# Altium PCB AirBnB-v1.1.PcbDoc (part 5 of 8)
Units mm, origin at the board's own origin, x right, y up, seen from the top; angles counter-clockwise.
Board outline 135.99 x 145 mm, 4 copper layers (Top Layer, Layer 2, Layer 3, Bottom Layer), stack 1.566 mm thick; 343 components, 205 nets, 1123 pads, 557 vias.
Unrouted connection lines stored in the file: 129.
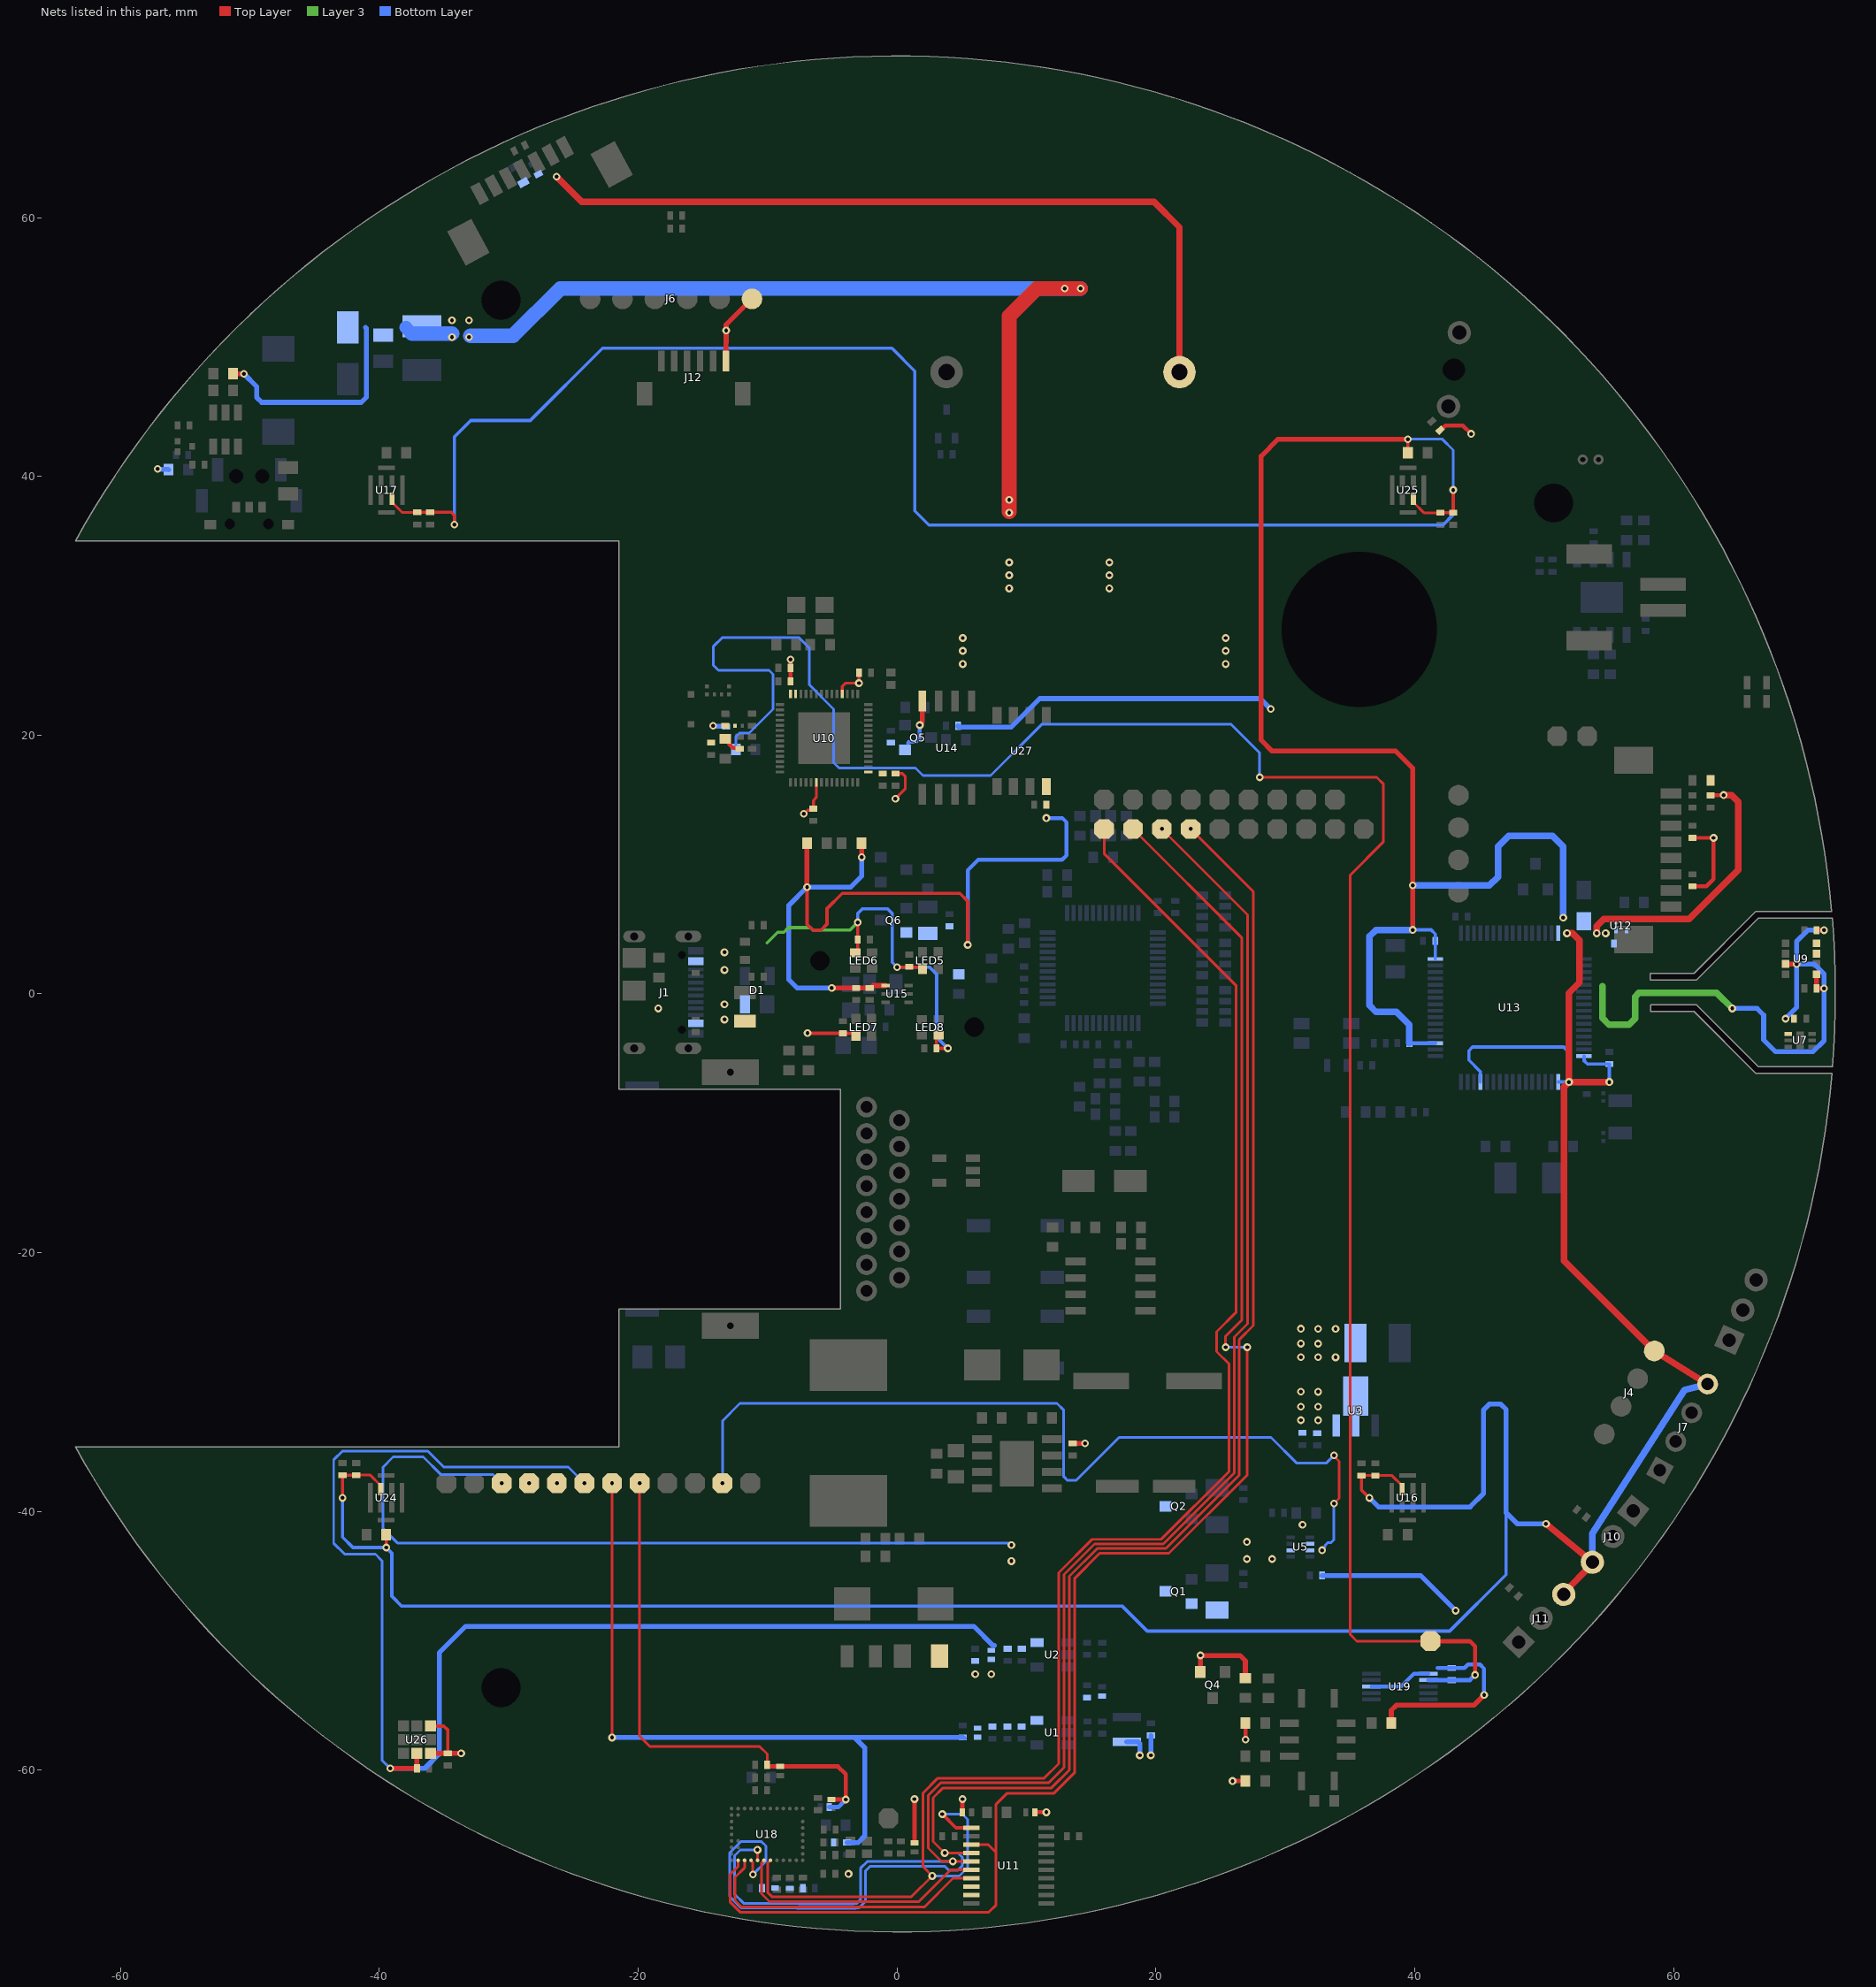
[diagram p4: the nets of this part, all layers, seen from the top]

## Part data (continued)
R51 R53 R58 R59: library part RC0603FR-0749R9L, "RES 49.9 OHM 1% 1/10W 0603", Case Code (Imperial)=0603, Case Code (Metric)=1608, LCSC Part Number=C114625, Manufacturer=Yageo, Max Operating Temperature=155°C, Max Power Dissipation=100mW, Min Operating Temperature=-55°C, Resistance Tolerance=1%, Resistor Type="Thick Film", Temperature Coefficient=100ppm/°C, Voltage Rating=50V, Case/Package=0603, Category="Chip SMD Resistors", ComponentLink1Description=https://datasheet.ciiva.com/11808/0900766b80f96399-11808223.pdf?src-supplier=RSComponents, ComponentLink1URL=https://datasheet.ciiva.com/11808/0900766b80f96399-11808223.pdf?src-supplier=RSComponents, ComponentLink2Description=https://datasheet.ciiva.com/22747/443971-22747527.pdf?src-supplier=Element14, ComponentLink2URL=https://datasheet.ciiva.com/22747/443971-22747527.pdf?src-supplier=Element14, ComponentLink3Description=https://datasheet.ciiva.com/15189/getdatasheetpartid-325421-15189750.pdf?src-supplier=Verical, ComponentLink3URL=https://datasheet.ciiva.com/15189/getdatasheetpartid-325421-15189750.pdf?src-supplier=Verical, Construction=Rectangular, Depth=0.8mm, Features="Moisture Resistant", Height=0.45mm, Item Type=Resistor, Lead Free="Lead Free", Length=1.6mm, Manufacturer Part Number=RC0603FR-0749R9L, Military Standard=Not, Number of Pins=2, Number of Terminations=2, Packaging="Tape and Reel", Power Rating=100mW, Pricing 1="5000=0.00280 (USD)", REACH SVHC="No SVHC", Resistance=49.9R, RoHS=Yes, RoHS Compliant=Yes, Series=RC, Size Code=0603, Stock 1=2075000, Supplier 1="Arrow Electronics", Supplier Part Number 1=RC0603FR-0749R9L, Technology="THICK FILM", Termination=SMD/SMT, Tolerance=1%, Voltage Rating (DC)=50V
R54: library part PE0805FRF470R03L, "RES 0.03 OHM 1% 1/2W 0805", Case/Package=0805, LCSC Part Number=C858599, Manufacturer=Yageo, Max Operating Temperature=170°C, Max Power Dissipation=500mW, Min Operating Temperature=-55°C, Package Quantity=5000, Supplier Part Number 1=7123965, Temperature Coefficient=100ppm/°C, Tolerance=1%, Category="Chip SMD Resistors", ComponentLink1Description=http://www.mouser.com/ds/2/447/PYu-PE_521_RoHS_L_5-1077989.pdf?src-supplier=Mouser, ComponentLink1URL=http://www.mouser.com/ds/2/447/PYu-PE_521_RoHS_L_5-1077989.pdf?src-supplier=Mouser, ComponentLink2Description=http://www.yageo.com/documents/recent/PYu-PE_521_RoHS_L_5.pdf?src-supplier=Digi-Key, ComponentLink2URL=http://www.yageo.com/documents/recent/PYu-PE_521_RoHS_L_5.pdf?src-supplier=Digi-Key, Features="Moisture Resistant,Automotive AEC-Q200", Height=0.024inch, Item Type=Resistor, Length=0.08inch, Manufacturer Part Number=PE0805FRF470R03L, Number of Terminations=2, Packaging="Tape and Reel", Pricing 1="5000=0.175, 10000=0.171, 15000=0.169, 20000=0.168, 25000=0.164 (USD)", RoHS=Yes, RoHS Compliant=Yes, Series=PE, Stock 1=20000, Supplier 1="Future Electronics", Width=0.05inch
R60: library part RC0603FR-074R7L, "RES 4.7 OHM 1% 1/10W 0603", Case Code (Imperial)=0603, Case Code (Metric)=1608, LCSC Part Number=C137705, Manufacturer=Yageo, Max Operating Temperature=155°C, Max Power Dissipation=100mW, Min Operating Temperature=-55°C, Package Quantity=5000, Resistance Tolerance=1%, Resistor Type="Thick Film", Supplier Part Number 1=3598901, Temperature Coefficient=200ppm/°C, Voltage Rating=50V, Case/Package=0603, Category="Chip SMD Resistors", ComponentLink1Description=https://datasheet.ciiva.com/46440/1868787-46440910.pdf?src-supplier=Element14, ComponentLink1URL=https://datasheet.ciiva.com/46440/1868787-46440910.pdf?src-supplier=Element14, ComponentLink2Description=https://datasheet.ciiva.com/12555/rc0603-272842-12555071.pdf?src-supplier=Mouser, ComponentLink2URL=https://datasheet.ciiva.com/12555/rc0603-272842-12555071.pdf?src-supplier=Mouser, Features="Moisture Resistant", Height=0.45mm, Item Type=Resistor, Lead Free="Lead Free", Length=1.6mm, Manufacturer Part Number=RC0603FR-074R7L, Number of Terminations=2, Packaging="Tape and Reel", Pins=2, Power Rating=100mW, Pricing 1="5000=0.0036, 25000=0.0034, 125000=0.0032, 250000=0.0031, 750000=0.0029 (USD)", Reach SVHC Compliant=Unknown, RoHS=Yes, Series=RC, Stock 1=160000, Supplier 1="Future Electronics", Termination=SMD/SMT, Tolerance=1%, Voltage Rating (DC)=50V, Width=0.8mm
R61 R62 R63 R64: library part RC0603FR-0733RL, "RES SMD 0603 33 Ohm 1% 1/10W", Case Code (Imperial)=0603, Case Code (Metric)=1608, LCSC Part Number=C108661, Manufacturer=Yageo, Max Operating Temperature=155°C, Max Power Dissipation=100mW, Min Operating Temperature=-55°C, Package Quantity=1, Resistance Tolerance=1%, Resistor Type="Thick Film", Supplier Part Number 1=311-33.0HRCT-ND, Temperature Coefficient=100ppm/°C, Voltage Rating=75V, Voltage Rating (DC)=50V, Case/Package=0603, Category="Chip SMD Resistors", ComponentLink1Description=https://datasheet.ciiva.com/11808/0900766b80f96399-11808741.pdf?src-supplier=RSComponents, ComponentLink1URL=https://datasheet.ciiva.com/11808/0900766b80f96399-11808741.pdf?src-supplier=RSComponents, ComponentLink2Description=https://datasheet.ciiva.com/2453/pyu-r-int-thick-7-2453952.pdf?src-supplier=Digi-Key, ComponentLink2URL=https://datasheet.ciiva.com/2453/pyu-r-int-thick-7-2453952.pdf?src-supplier=Digi-Key, ComponentLink3Description=https://datasheet.ciiva.com/2453/pyu-r-int-thick-7-2453953.pdf?src-supplier=Digi-Key, ComponentLink3URL=https://datasheet.ciiva.com/2453/pyu-r-int-thick-7-2453953.pdf?src-supplier=Digi-Key, ComponentLink4Description=https://datasheet.ciiva.com/2453/pyu-r-int-thick-7-2453954.pdf?src-supplier=Digi-Key, ComponentLink4URL=https://datasheet.ciiva.com/2453/pyu-r-int-thick-7-2453954.pdf?src-supplier=Digi-Key, ComponentLink5Description=https://datasheet.ciiva.com/7660/38590-7660792.pdf?src-supplier=Element14, ComponentLink5URL=https://datasheet.ciiva.com/7660/38590-7660792.pdf?src-supplier=Element14, ComponentLink6Description=https://datasheet.ciiva.com/15189/getdatasheetpartid-326673-15189708.pdf?src-supplier=Verical, ComponentLink6URL=https://datasheet.ciiva.com/15189/getdatasheetpartid-326673-15189708.pdf?src-supplier=Verical, ComponentLink7Description=https://datasheet.ciiva.com/7746/443971-7746334.pdf?src-supplier=Element14, ComponentLink7URL=https://datasheet.ciiva.com/7746/443971-7746334.pdf?src-supplier=Element14, ComponentLink8Description=https://datasheet.ciiva.com/7746/443971-7746335.pdf?src-supplier=Element14, ComponentLink8URL=https://datasheet.ciiva.com/7746/443971-7746335.pdf?src-supplier=Element14, ComponentLink9Description=https://datasheet.ciiva.com/46395/443971-46395007.pdf?src-supplier=Element14, ComponentLink9URL=https://datasheet.ciiva.com/46395/443971-46395007.pdf?src-supplier=Element14, Construction=Rectangular, Depth=0.8mm, Features="Moisture Resistant", Height=0.45mm, Item Type=Resistor, Lead Free="Lead Free", Lead Pitch=0.3mm, Length=1.6mm, Manufacturer Part Number=RC0603FR-0733RL, Military Standard=Not, Number of Pins=2, Number of Terminations=2, Packaging="Tape and Reel", Power Rating=100mW, Pricing 1="1=0.10000, 10=0.02400, 100=0.00970, 1000=0.00436, 2500=0.00378 (USD)", REACH SVHC="No SVHC", Resistance=33R, RoHS=Yes, RoHS Compliant=Yes, Series=RC, Size Code=0603, Stock 1=41, Supplier 1=Digi-Key, Technology="THICK FILM", Termination=SMD/SMT, Tolerance=1%, Weight=7.1E-05oz, Width=0.8mm
R65: library part RT0603BRD07301KL, "100mW Thin Film Resistor ±25ppm/℃ ±0.1% 301kΩ 0603 Chip Resistor - Surface Mount ROHS", LCSC Part Number=C861309, Manufacturer=YAGEO, ComponentLink1Description=LCSC, ComponentLink1URL=https://www.lcsc.com/product-detail/Chip-Resistor-Surface-Mount_YAGEO-RT0603BRD07301KL_C861309.html, Item=Resistor, Manufacturer Part Number=RT0603BRD07301KL
R66: library part RT0603BRE0757K6L, "RES SMD 57.6KOHM 0.1% 1/10W 0603", LCSC Part Number=C849817, Manufacturer=YAGEO, Package=0603, ComponentLink1Description=LCSC, ComponentLink1URL=https://www.lcsc.com/product-detail/Chip-Resistor-Surface-Mount_YAGEO-RT0603BRE0757K6L_C849817.html, Item Type=Resistor, Manufacturer Part Number=RT0603BRE0757K6L
R67: library part RC0603FR-0712K4L, "RES SMD 12.4K OHM 1% 1/10W 0603", Case Code (Imperial)=0603, Case Code (Metric)=1608, LCSC Part Number=C137798, Manufacturer=Yageo, Max Operating Temperature=155°C, Max Power Dissipation=100mW, Min Operating Temperature=-55°C, Package Quantity=1, Resistance=12.4kR, Resistor Type="Thick Film", Supplier Part Number 1=311-12.4KHRCT-ND, Temperature Coefficient=100ppm/°C, Tolerance=1%, Voltage Rating=50V, Working Voltage=75V, Case/Package=0603, Category="Chip SMD Resistors", ComponentLink1Description=https://datasheet.ciiva.com/2454/pyu-r-int-thick-7-2454069.pdf?src-supplier=Digi-Key, ComponentLink1URL=https://datasheet.ciiva.com/2454/pyu-r-int-thick-7-2454069.pdf?src-supplier=Digi-Key, ComponentLink2Description=https://datasheet.ciiva.com/2454/pyu-r-int-thick-7-2454070.pdf?src-supplier=Digi-Key, ComponentLink2URL=https://datasheet.ciiva.com/2454/pyu-r-int-thick-7-2454070.pdf?src-supplier=Digi-Key, ComponentLink3Description=https://datasheet.ciiva.com/2454/pyu-r-int-thick-7-2454071.pdf?src-supplier=Digi-Key, ComponentLink3URL=https://datasheet.ciiva.com/2454/pyu-r-int-thick-7-2454071.pdf?src-supplier=Digi-Key, Construction=Rectangular, Depth=0.8mm, Features="Moisture Resistant", Height=0.022inch, Lead Free="Lead Free", Length=0.063inch, Manufacturer Part Number=RC0603FR-0712K4L, Military Standard=Not, Number of Terminations=2, Packaging="Tape and Reel", Power Rating=100mW, Pricing 1="1=0.10000, 10=0.02400, 100=0.00970, 1000=0.00436, 2500=0.00378 (USD)", RoHS=Yes, RoHS Compliant=Yes, Series=RC, Stock 1=494008, Supplier 1=Digi-Key, Technology="THICK FILM", Termination=SMD/SMT, Voltage Rating (DC)=50V, Width=0.031inch
R71: library part ERJ-2GEJ151X, "RES SMD 150 OHM 5% 1/10W 0402", Case Code (Imperial)=0402, Case Code (Metric)=1005, LCSC Part Number=C412976, Manufacturer=Panasonic, Max Operating Temperature=155°C, Max Power Dissipation=100mW, Min Operating Temperature=-55°C, Package Quantity=10000, Ratings=AEC-Q200, Resistance Tolerance=5%, Resistor Type="Thick Film", Supplier Part Number 1=65T8254, Temperature Coefficient=200ppm/°C, Voltage Rating=50V, Case/Package=0402, Category="Chip SMD Resistors", ComponentLink1Description=https://datasheet.ciiva.com/11821/0900766b80f806dd-11821182.pdf?src-supplier=RSComponents, ComponentLink1URL=https://datasheet.ciiva.com/11821/0900766b80f806dd-11821182.pdf?src-supplier=RSComponents, ComponentLink2Description=https://datasheet.ciiva.com/43460/1500035-43460367.pdf?src-supplier=Farnell, ComponentLink2URL=https://datasheet.ciiva.com/43460/1500035-43460367.pdf?src-supplier=Farnell, ComponentLink3Description=https://datasheet.ciiva.com/6082/1500035-6082105.pdf?src-supplier=Farnell, ComponentLink3URL=https://datasheet.ciiva.com/6082/1500035-6082105.pdf?src-supplier=Farnell, ComponentLink4Description=https://datasheet.ciiva.com/46377/1500035-46377070.pdf?src-supplier=Element14, ComponentLink4URL=https://datasheet.ciiva.com/46377/1500035-46377070.pdf?src-supplier=Element14, ComponentLink5Description=https://datasheet.ciiva.com/28568/1678796-28568939.pdf?src-supplier=Element14, ComponentLink5URL=https://datasheet.ciiva.com/28568/1678796-28568939.pdf?src-supplier=Element14, ComponentLink6Description=https://datasheet.ciiva.com/16773/70260739-16773454.pdf?src-supplier=Allied+Electronics, ComponentLink6URL=https://datasheet.ciiva.com/16773/70260739-16773454.pdf?src-supplier=Allied+Electronics, ComponentLink7Description=https://datasheet.ciiva.com/30178/4aoa0000ce1-30178453.pdf?src-supplier=Onlinecomponents.com, ComponentLink7URL=https://datasheet.ciiva.com/30178/4aoa0000ce1-30178453.pdf?src-supplier=Onlinecomponents.com, Construction=Rectangular, Contact Plating=Tin, Depth=0.5mm, Features="Automotive AEC-Q200", Height=0.35mm, Item Type=Resistor, Lead Free="Lead Free", Length=1mm, Manufacturer Part Number=ERJ-2GEJ151X, Military Standard=Not, Mount="Surface Mount", Number of Terminations=2, Packaging="Tape and Reel", Power Rating=100mW, Pricing 1="1=0.10100, 25=0.03200, 100=0.01300, 250=0.01100, 500=0.00900, 1000=0.00500 (USD)", Radiation Hardening=No, Reach SVHC Compliant=Yes, Resistance=150R, RoHS=Yes, RoHS Compliant=Yes, Series=ERJ, Stock 1=19191, Supplier 1=Avnet, Technology="THICK FILM", Termination=SMD/SMT, Tolerance=5%, Voltage Rating (DC)=50V, Weight=2.8E-05oz, Width=0.5mm, Working Voltage=50V
R74: library part RC0402FR-074K7L, "RES 4.7K OHM 1% 1/16W 0402", Case Code (Imperial)=0402, Case Code (Metric)=1005, LCSC Part Number=C105871, Manufacturer=Yageo, Max Operating Temperature=155°C, Max Power Dissipation=63mW, Min Operating Temperature=-55°C, Power Rating=62.5mW, Resistance=4.7kR, Resistance Tolerance=1%, Resistor Type="Thick Film", Temperature Coefficient=100ppm/°C, Voltage Rating=50V, Case/Package=0402, Category="Chip SMD Resistors", ComponentLink1Description=https://datasheet.ciiva.com/22661/1686128-22661342.pdf?src-supplier=Element14, ComponentLink1URL=https://datasheet.ciiva.com/22661/1686128-22661342.pdf?src-supplier=Element14, ComponentLink2Description=https://datasheet.ciiva.com/7850/1018594-7850022.pdf?src-supplier=Element14, ComponentLink2URL=https://datasheet.ciiva.com/7850/1018594-7850022.pdf?src-supplier=Element14, ComponentLink3Description=https://datasheet.ciiva.com/7850/1018594-7850023.pdf?src-supplier=Element14, ComponentLink3URL=https://datasheet.ciiva.com/7850/1018594-7850023.pdf?src-supplier=Element14, ComponentLink4Description=https://datasheet.ciiva.com/15215/getdatasheetpartid-328119-15215035.pdf?src-supplier=Verical, ComponentLink4URL=https://datasheet.ciiva.com/15215/getdatasheetpartid-328119-15215035.pdf?src-supplier=Verical, Construction=Rectangular, Depth=0.5mm, Features="Moisture Resistant", Height=0.32mm, Height - Seated (Max)=0.016inch, Item Type=Resistor, Lead Free="Lead Free", Length=1mm, Manufacturer Part Number=RC0402FR-074K7L, Military Standard=Not, Number of Pins=2, Number of Terminations=2, Packaging="Tape and Reel", Pricing 1="10000=0.00085 (USD)", Reach SVHC Compliant=Yes, RoHS=Yes, RoHS Compliant=Yes, Series=RC, Size Code=0402, Stock 1=2420000, Supplier 1=Avnet, Supplier Part Number 1=RC0402FR-074K7L, Termination=SMD/SMT, Tolerance=1%, Voltage Rating (DC)=50V, Width=0.5mm
R75: library part RT0402BRD0786K6L, "RES SMD 86.6KOHM 0.1% 1/16W 0402", Case Code (Imperial)=0402, Case Code (Metric)=1005, LCSC Part Number=C852935, Manufacturer=Yageo, Max Operating Temperature=125°C, Max Power Dissipation=63mW, Min Operating Temperature=-55°C, Package Quantity=10000, Power Rating=62.5mW, Supplier Part Number=13-RT0402BRD0786K6LCT-ND, Temperature Coefficient=25ppm/°C, Tolerance=0.1%, Voltage Rating=50V, Case/Package=0402, Category="Chip SMD Resistors", ComponentLink1Description=https://datasheet.ciiva.com/2582/pyu-rt-1-to-0-05-rohs-l-5-2582513.pdf?src-supplier=Digi-Key, ComponentLink1URL=https://datasheet.ciiva.com/2582/pyu-rt-1-to-0-05-rohs-l-5-2582513.pdf?src-supplier=Digi-Key, Height=0.014inch, Item Type=Resistor, Lead Free="Lead Free", Length=0.039inch, Manufacturer Part Number=RT0402BRD0786K6L, Number of Terminations=2, Packaging="Tape and Reel", Pricing="1=0.38, 10=0.323, 50=0.1704, 100=0.1263, 500=0.07636, 1000=0.05287, 5000=0.04406 (USD)", RoHS=Yes, RoHS Compliant=Yes, Series=RT, Stock=2259, Supplier=Digi-Key, Termination=SMD/SMT, Voltage Rating (DC)=50V, Width=0.02inch
RN1 RN2 RN3: library part YC164-FR-0710KL, "RES ARRAY 4 RES 10K OHM 1206", Case Code (Imperial)=1206, Case Code (Metric)=3216, LCSC Part Number=C110924, Manufacturer=Yageo, Max Operating Temperature=155°C, Min Operating Temperature=-55°C, Number of Resistors=4, Power Per Element=62.5mW, Resistance Tolerance=1%, Supplier Part Number 1=5054288, Temperature Coefficient=200ppm/°C, Voltage Rating=50V, Category="Resistor Arrays", Circuit Type=Isolated, ComponentLink1Description=http://www.farnell.com/datasheets/2167431.pdf?src-supplier=Farnell, ComponentLink1URL=http://www.farnell.com/datasheets/2167431.pdf?src-supplier=Farnell, ComponentLink2Description=https://media.digikey.com/pdf/Data%20Sheets/Yageo%20PDFs/YC102-358,TC122-164_Series_DS.pdf?src-supplier=Digi-Key, ComponentLink2URL=https://media.digikey.com/pdf/Data%20Sheets/Yageo%20PDFs/YC102-358,TC122-164_Series_DS.pdf?src-supplier=Digi-Key, ComponentLink3Description=http://www.farnell.com/datasheets/2167431.pdf?src-supplier=Element14, ComponentLink3URL=http://www.farnell.com/datasheets/2167431.pdf?src-supplier=Element14, ComponentLink4Description=http://www.farnell.com/datasheets/443424.pdf?src-supplier=Element14, ComponentLink4URL=http://www.farnell.com/datasheets/443424.pdf?src-supplier=Element14, ComponentLink5Description=http://www.farnell.com/datasheets/2167431.pdf?src-supplier=Newark, ComponentLink5URL=http://www.farnell.com/datasheets/2167431.pdf?src-supplier=Newark, Height=0.028inch, Item Type="Resistor Array", Lead Free="Lead Free", Length=0.126inch, Manufacturer Part Number=YC164-FR-0710KL, Mounting Technology="Surface Mount", Number of Circuits=4, Number of Elements=4, Packaging="Tape and Reel", Pins=8, Pricing 1="5000=0.0101, 20000=0.0095, 50000=0.0092, 125000=0.0089, 200000=0.0085 (USD)", Reach SVHC Compliant=Unknown, RoHS=Yes, RoHS Compliant=Yes, Series=YC164, Stock 1=25000, Supplier 1="Future Electronics", Tolerance=1%, Width=0.063inch
RT1: library part "MF52B 103F3950-100", "10kΩ 50mW ±1% 3950K ±1% - NTC Thermistors ROHS", LCSC Part Number=C394021, Manufacturer="Nanjing Shiheng Elec", Package=Custom, ComponentLink1Description=LCSC, ComponentLink1URL=https://www.lcsc.com/product-detail/NTC-Thermistors_Nanjing-Shiheng-Elec-MF52B-103F3950-100_C394021.html, Item Type="NTC Thermistor", Manufacturer Part Number="MF52B 103F3950-100"
SB1 SB2 SB5 SB6: "Solder Bridge ON", Item Type="Solder Bridge", Manufacturer Part Number="Solder Bridge 0402"
SB3 SB4: "Solder Bridge ON", Manufacturer Part Number="Solder Bridge", Item Type="Solder Bridge"
SW1: "3mm 2mm Round Button 50mA Top3.65mm SPST 12V SMD Tactile Switches", LCSC Part Number=C318893, Manufacturer=XKB, ComponentLink1Description=LCSC, ComponentLink1URL=https://lcsc.com/product-detail/Tactile-Switches_XKB-Connectivity-TS-1185EC-C-D-B_C318893.html, Manufacturer Part Number=TS-1185EC-C-D-B
SW2: "50mA 100MΩ 100000 Times 260gf@±50gf 12V Surface Mount SPST SMD Tactile Switches ROHS", LCSC Part Number=C5381384, Manufacturer="ROCPU Switch", Package=SMD, ComponentLink1Description=LCSC, ComponentLink1URL=https://www.lcsc.com/product-detail/Tactile-Switches_ROCPU-Switches-TP12422673_C5381384.html, Item Type="Tactile Switch", Manufacturer Part Number=TP12422673
SW3: "Surface Mount 1A SPDT 6V Black 10000次 SMD Slide Switches ROHS", LCSC Part Number=C778185, Manufacturer=G-Switch, Package=SMD, ComponentLink1Description=LCSC, ComponentLink1URL=https://www.lcsc.com/product-detail/Slide-Switches_G-Switch-MK-11C04-G013_C778185.html, Item Type="Slide Switche", Manufacturer Part Number=MK-11C04-G013
SW4: "1A 16V Detection switch 50000次 Plugin Microswitches ROHS", LCSC Part Number=C2848627, Manufacturer="Korean Hroparts Elec", Package=Custom, ComponentLink1Description=LCSC, ComponentLink1URL=https://www.lcsc.com/product-detail/Microswitches_Korean-Hroparts-Elec-K5-1678DA-01_C2848627.html, Item Type=Switch, Manufacturer Part Number=K5-1678DA-01
U1: "300mA 80dB@(1kHz) 305mV@(300mA) Fixed 3.3V~3.3V Positive 1 5.5V SOT-25-5 Linear Voltage Regulators (LDO) ROHS", LCSC Part Number=C69841, Manufacturer="Torex Semicon", Package=SOT-25-5, ComponentLink1Description=LCSC, ComponentLink1URL=https://www.lcsc.com/product-detail/Linear-Voltage-Regulators-LDO_Torex-Semicon-XC6228D332VR-G_C69841.html, Item Type=IC, Manufacturer Part Number=XC6228D332VR-G
U2: "300mA 80dB@(1kHz) 410mV@(300mA) Fixed 1.8V~1.8V Positive 1 5.5V SOT-25-5 Linear Voltage Regulators (LDO) ROHS", LCSC Part Number=C216644, Manufacturer="Torex Semicon", Package=SOT-25-5, ComponentLink1Description=LCSC, ComponentLink1URL=https://www.lcsc.com/product-detail/Linear-Voltage-Regulators-LDO_Torex-Semicon-XC6228D182VR-G_C216644.html, Item Type=IC, Manufacturer Part Number=XC6228D182VR-G
U3: "75dB@(120Hz) 1A Fixed 3.3V~3.3V Positive 15V SOT-89-3 Linear Voltage Regulators (LDO) ROHS", LCSC Part Number=C81768, Manufacturer=UTC, Package=SOT-89-3, ComponentLink1Description=LCSC, ComponentLink1URL=https://www.lcsc.com/product-detail/Linear-Voltage-Regulators-LDO_UTC-Unisonic-Tech-LD1117AG-33-AB3-A-R_C81768.html, Item Type=IC, Manufacturer Part Number=LD1117AG-33-AB3-A-R
U4: "ESOP-8 Battery Management ICs ROHS", LCSC Part Number=C16581, Manufacturer=TOPPOWER, Package=ESOP-8, ComponentLink1Description=LCSC, ComponentLink1URL=https://www.lcsc.com/product-detail/Battery-Management-ICs_TOPPOWER-Nanjing-Extension-Microelectronics-TP4056-42-ESOP8_C16581.html, Item Type=Mosfet, Manufacturer Part Number=TP4056-42-ESOP8
U5: "1.6-V TO 5.5-V, 40-M, 2.5-A, LOW", LCSC Part Number=C3235557, Manufacturer="Texas Instruments", Supplier Part Number 1=595-TPS2116DRLR, Category="Voltage Supervisors", ComponentLink1Description=LCSC, ComponentLink1URL=https://www.lcsc.com/product-detail/Power-Distribution-Switches_Texas-Instruments-TPS2116DRLR_C3235557.html, Item Type=IC, Manufacturer Part Number=TPS2116DRLR, Pricing 1="1=0.9, 10=0.814, 50=0.772, 100=0.634, 1000=0.414, 10000=0.363 (USD)", RoHS=Yes, Stock 1=27931, Supplier 1=Mouser
U6: "boost converterType 1 Boost 28V 2V~24V 1.2MHz SOT-23-6 DC-DC Converters ROHS", LCSC Part Number=C84817, Manufacturer="XI'AN Aerosemi Tech", Package=SOT-23-6, ComponentLink1Description=LCSC, ComponentLink1URL=https://www.lcsc.com/product-detail/DC-DC-Converters_XI-AN-Aerosemi-Tech-MT3608_C84817.html, Item Type=IC, Manufacturer Part Number=MT3608
U7: "DFN-6-EP(2x2) Temperature and Humidity Sensor ROHS", LCSC Part Number=C2837688, Manufacturer=GXCAS, Package=DFN-6-EP(2x2), ComponentLink1Description=LCSC, ComponentLink1URL=https://www.lcsc.com/product-detail/Temperature-and-Humidity-Sensor_GXCAS-GXHTC3_C2837688.html, Item Type="Temperature & Humidity Sensor", Manufacturer Part Number=GXHTC3
U8: "CO/NO2/NH3 Triple Gas Sensor Metaloxide Gas Detection Sensor SMD T/R", LCSC Part Number=C3659383, Manufacturer=Amphenol, Category=Sensors, Item Type="(CO) Sensor", Manufacturer Part Number=MICS-6814, Pricing 1="1=10.8025, 10=10.7911 (USD)", RoHS=No, Stock 1=100, Supplier 1="Arrow Electronics", Supplier Part Number 1=MICS-6814
U9: "SENSOR RH PRESSURE TEMP VOC", LCSC Part Number=C125972, Manufacturer="Bosch Sensortec", Max Operating Temperature=85°C, Min Operating Temperature=-40°C, Supplier Part Number 1=7107186, Category=Uncategorized, ComponentLink1Description=https://ae-bst.resource.bosch.com/media/_tech/media/application_notes/BST-BME680-HS000-05.pdf?src-supplier=Digi-Key, ComponentLink1URL=https://ae-bst.resource.bosch.com/media/_tech/media/application_notes/BST-BME680-HS000-05.pdf?src-supplier=Digi-Key, ComponentLink2Description=https://ae-bst.resource.bosch.com/media/_tech/media/product_flyer/BST-BME680-FL000.pdf?src-supplier=Digi-Key, ComponentLink2URL=https://ae-bst.resource.bosch.com/media/_tech/media/product_flyer/BST-BME680-FL000.pdf?src-supplier=Digi-Key, Item Type="Temperature Sensor", Manufacturer Part Number=BME680, Output Type=SPI,I2C, Pricing 1="1=9.84000, 20=8.81000, 125=8.18000, 500=7.71000, 3000=7.09000 (USD)", RoHS=No, Sensor Type=Temperature, Stock 1=64, Supplier 1="Future Electronics"
U10: "SMD IC ESP32-S3R8, DUAL-CORE MCU", Manufacturer="Espressif Systems", Supplier Part Number 1=356-ESP32-S3R8, Category="RF Receivers, Transceivers", Item Type=IC, Manufacturer Part Number=ESP32-S3R8, Pricing 1="1=2.46, 10=2.46, 50=2.46, 100=2.46, 1000=2.46, 10000=2.46 (USD)", RoHS=No, Stock 1=2366, Supplier 1=Mouser
U11: "IC TRANSLATOR BIDIR 20TSSOP", LCSC Part Number=C17206, Manufacturer="Texas Instruments", Package=20-TSSOP, ComponentLink1Description=LCSC, ComponentLink1URL=https://www.lcsc.com/product-detail/Translators-Level-Shifters_Texas-Instruments-TXS0108EPWR_C17206.html, Item Type=IC, Manufacturer Part Number=TXS0108EPWR
U12: "IC REG LINEAR 3.3V 200MA 6DFN", Case/Package=DFN, Dropout Voltage=150mV, LCSC Part Number=C2971162, Manufacturer=STMicroelectronics, Max Operating Temperature=125°C, Max Output Current=200mA, Max Supply Voltage=5.5V, Min Input Voltage=1.9V, Min Operating Temperature=-40°C, Nominal Output Voltage=3.3V, Operating Supply Current=50uA, Package Quantity=6000, Power Supply Rejection Ratio (PSRR)=55dB, Quiescent Current=60uA, Supplier Part Number 1=511-LDK120PU33R, Accuracy=2%, Category="Voltage Regulators - Linear", ComponentLink1Description=https://datasheet.ciiva.com/48475/dm00070790-48475005.pdf?src-supplier=Avnet, ComponentLink1URL=https://datasheet.ciiva.com/48475/dm00070790-48475005.pdf?src-supplier=Avnet, Height=0.45mm, Item Type=IC, Lead Free="Lead Free", Length=1.3mm, Manufacturer Part Number=LDK120PU33R, Mounting Technology="Surface Mount", Number of Outputs=1, Number of Regulators=1, Output Current=200mA, Output Type=Fixed, Output Voltage=3.3V, Packaging="Tape and Reel", Pins=6, Polarity=Positive, Pricing 1="1=0.91, 10=0.752, 50=0.752, 100=0.614, 1000=0.388, 10000=0.343 (USD)", Radiation Hardening=No, Reach SVHC Compliant=No, RoHS=Yes, RoHS Compliant=Yes, Series=-, Stock 1=1169, Supplier 1=Mouser, Width=1.2mm
U13: "IC MCU 32BIT 256KB FLASH 64LQFP", Case/Package=LQFP, Frequency=180MHz, LCSC Part Number=C915971, Manufacturer=STMicroelectronics, Max Supply Voltage=3.6V, Min Supply Voltage=1.7V, Supplier Part Number 1=511-STM32F446RCT6, Category=Microcontrollers, ComponentLink1Description=http://www.farnell.com/datasheets/2309063.pdf?src-supplier=Farnell, ComponentLink1URL=http://www.farnell.com/datasheets/2309063.pdf?src-supplier=Farnell, ComponentLink2Description=http://www.mouser.com/ds/2/389/stm32f446mc-956216.pdf?src-supplier=Mouser, ComponentLink2URL=http://www.mouser.com/ds/2/389/stm32f446mc-956216.pdf?src-supplier=Mouser, ComponentLink3Description=http://www.farnell.com/datasheets/2309063.pdf?src-supplier=Element14, ComponentLink3URL=http://www.farnell.com/datasheets/2309063.pdf?src-supplier=Element14, ComponentLink4Description=http://www.st.com/content/ccc/resource/technical/document/errata_sheet/c3/6b/f8/32/fc/01/48/6e/DM00155929.pdf/files/DM00155929.pdf/jcr:content/translations/en.DM00155929.pdf?src-supplier=Digi-Key, ComponentLink4URL=http://www.st.com/content/ccc/resource/technical/document/errata_sheet/c3/6b/f8/32/fc/01/48/6e/DM00155929.pdf/files/DM00155929.pdf/jcr:content/translations/en.DM00155929.pdf?src-supplier=Digi-Key, ComponentLink5Description=http://www.farnell.com/datasheets/2309063.pdf?src-supplier=Newark, ComponentLink5URL=http://www.farnell.com/datasheets/2309063.pdf?src-supplier=Newark, ComponentLink6Description=http://www.st.com/st-web-ui/static/active/en/resource/technical/document/datasheet/DM00141306.pdf?src-supplier=Avnet, ComponentLink6URL=http://www.st.com/st-web-ui/static/active/en/resource/technical/document/datasheet/DM00141306.pdf?src-supplier=Avnet, Item Type=IC, Lead Free="Lead Free", Manufacturer Part Number=STM32F446RCT6, Memory Size=256KB, Number of I/Os=50, Pins=64, Pricing 1="1=10.62, 10=9.6, 50=8.98, 100=7.95, 1000=6.28, 10000=6.28 (USD)", RAM Size=128KB, Reach SVHC Compliant=No, RoHS=Yes, RoHS Compliant=Yes, Stock 1=998, Supplier 1=Mouser
U14: "IC FLASH 128MBIT SPI/QUAD 8SOIC", Case/Package=SOIC, Frequency=133MHz, LCSC Part Number=C97521, Manufacturer=Winbond, Max Operating Temperature=85°C, Min Operating Temperature=-40°C, Category=Flash, ComponentLink1Description=http://www.winbond.com/resource-files/w25q128jv%20revf%2003272018%20plus.pdf?src-supplier=Digikey, ComponentLink1URL=http://www.winbond.com/resource-files/w25q128jv%20revf%2003272018%20plus.pdf?src-supplier=Digikey, Item Type=IC, Manufacturer Part Number=W25Q128JVSIQ, Memory Format=Non-Volatile,FLASH, Memory Size=128Mb, Mounting Technology="Surface Mount", Packaging=Tray, Pricing="1=1.6411, 10=1.4568, 25=1.4422, 50=1.3009, 100=1.2498, 250=1.2373, 500=1.1781, 1000=1.1392, 5000=1.0957 (USD)", RoHS=Yes, RoHS Compliant=Yes, Series=SpiFlash®, Stock=3659, Supplier="Arrow Electronics", Supplier Part Number=W25Q128JVSIQ
U15: library part LTR-303ALS-01, "SENSOR OPT AMBIENT 6DFN", Case/Package=DFN, LCSC Part Number=C364577, Manufacturer="Vishay Lite-On", Max Operating Temperature=70°C, Min Operating Temperature=-30°C, Category=Uncategorized, ComponentLink1Description=http://optoelectronics.liteon.com/upload/download/DS86-2013-0004/LTR-303ALS-01_DS_V1.pdf?src-supplier=Digi-Key, ComponentLink1URL=http://optoelectronics.liteon.com/upload/download/DS86-2013-0004/LTR-303ALS-01_DS_V1.pdf?src-supplier=Digi-Key, ComponentLink2Description=http://optoelectronics.liteon.com/upload/download/DS86-2013-0004/P_100_LTR-303ALS-01%20DS.pdf?src-supplier=Avnet, ComponentLink2URL=http://optoelectronics.liteon.com/upload/download/DS86-2013-0004/P_100_LTR-303ALS-01%20DS.pdf?src-supplier=Avnet, Item Type="Ambient Light Sensor", Manufacturer Part Number=LTR-303ALS-01, Mounting Technology="Surface Mount", Output Type=I2C, Packaging="Cut Tape", Pins=6, Pricing 1="1=0.5742, 10=0.465, 25=0.4604, 100=0.394, 250=0.39, 500=0.3741, 1000=0.3355 (USD)", RoHS=Yes, RoHS Compliant=Yes, Series=-, Stock 1=1717, Supplier 1="Arrow Electronics", Supplier Part Number 1=LTR-303ALS-01
U16 U17 U24 U25: "MIC MEMS DIGITAL PDM OMNI -26DB", LCSC Part Number=C503097, Manufacturer=STMicroelectronics, Operating Supply Current=650uA, Supplier Part Number 1=511-MP34DT06JTR, Voltage Rating=1.8V, Category=Microphones, ComponentLink1Description=http://www.farnell.com/datasheets/2710895.pdf?src-supplier=Farnell, ComponentLink1URL=http://www.farnell.com/datasheets/2710895.pdf?src-supplier=Farnell, ComponentLink2Description=https://www.st.com/resource/en/datasheet/mp34dt06j.pdf?src-supplier=Digi-Key, ComponentLink2URL=https://www.st.com/resource/en/datasheet/mp34dt06j.pdf?src-supplier=Digi-Key, ComponentLink3Description=http://www.farnell.com/datasheets/2710895.pdf?src-supplier=Newark, ComponentLink3URL=http://www.farnell.com/datasheets/2710895.pdf?src-supplier=Newark, ComponentLink4Description=http://www.farnell.com/datasheets/2710895.pdf?src-supplier=Element14, ComponentLink4URL=http://www.farnell.com/datasheets/2710895.pdf?src-supplier=Element14, Direction=Omnidirectional, Item Type=Microphone, Manufacturer Part Number=MP34DT06JTR, Packaging="Cut Tape", Pricing 1="1=2.31, 10=1.92, 50=1.6, 100=1.51, 1000=1.24, 10000=1.23 (USD)", RoHS=Yes, RoHS Compliant=Yes, Series=-, Shape=Rectangular, Stock 1=6064, Supplier 1=Mouser, Termination=Solder
U18: "Rf Transceiver PG-VF2BGA-40", LCSC Part Number=C3606641, Manufacturer=Infineon, Supplier Part Number 1=25AK0242, Category="RF Receivers, Transceivers", ComponentLink1Description=LCSC, ComponentLink1URL=https://www.lcsc.com/product-detail/RF-Transceiver-ICs_Infineon-Technologies-BGT60TR13CE6327XUMA1_C3606641.html, Item Type=IC, Manufacturer Part Number=BGT60TR13CE6327XUMA1, Pricing 1="1=20.67000, 10=18.89000, 25=17.50000, 50=16.72000, 100=15.93000, 250=15.16000, 500=14.94000, 1000=14.51000 (USD)", RoHS=No, Stock 1=4397, Supplier 1=Newark
U19: "IC ADC 12BIT SIGMA-DELTA 10VSSOP", Case/Package=VSSOP, LCSC Part Number=C193969, Manufacturer="Texas Instruments", Max Operating Temperature=125°C, Max Supply Voltage=5.5V, Min Operating Temperature=-40°C, Min Supply Voltage=2V, Operating Supply Voltage=3.3V, Package Quantity=2500, Power Dissipation=900uW, Supplier Part Number 1=296-41185-1-ND, Category="Analog to Digital Converters (ADCs)", ComponentLink1Description=https://datasheet.ciiva.com/14260/sbas473c-14260076.pdf?src-supplier=Avnet, ComponentLink1URL=https://datasheet.ciiva.com/14260/sbas473c-14260076.pdf?src-supplier=Avnet, ComponentLink2Description=https://datasheet.ciiva.com/6662/ads1013-6662716.pdf?src-supplier=Digi-Key, ComponentLink2URL=https://datasheet.ciiva.com/6662/ads1013-6662716.pdf?src-supplier=Digi-Key, Contact Plating=Gold, Conversion Rate=3.3KS/s, Integral Nonlinearity (INL)=0.5LSB, Interface=I2C, Item Type=IC, Lead Free="Lead Free", Manufacturer Part Number=ADS1015IDGSR, Max Supply Voltage (DC)=5.5V, Min Supply Voltage (DC)=2V, Number of A/D Converters=1, Number of Bits=12, Number of Converters=1, Number of Elements=1, Number of Inputs=4, Number of Pins=10, Packaging="Tape and Reel", Polarity=Bipolar, Pricing 1="1=3.09000, 10=2.77500, 25=2.62360, 100=2.27370, 250=2.15712, 500=1.93556, 1000=1.65000 (USD)", Radiation Hardening=No, Reach SVHC Compliant=Yes, Resolution=12b, RoHS=Yes, RoHS Compliant=Yes, Sampling Rate=3.3KS/s, Series=-, Supplier 1=Digi-Key, Supply Type=Single
U20: "IC POE CNTRL 1 CHANNEL 8SOIC", Case/Package=D, LCSC Part Number=C2867397, Manufacturer="Texas Instruments", Max Operating Temperature=85°C, Max Power Dissipation=12.95W, Max Supply Voltage=57V, Min Current Limit=405mA, Min Operating Temperature=-40°C, Min Supply Voltage=0V, Operating Supply Current=240uA, Output Current=450mA, Package Quantity=2500, Power Dissipation=13W, Supplier Part Number 1=595-TPS2375DR, Category="Interface ICs", ComponentLink1Description=https://datasheet.ciiva.com/1943/tps2375-1943071.pdf?src-supplier=Digi-Key, ComponentLink1URL=https://datasheet.ciiva.com/1943/tps2375-1943071.pdf?src-supplier=Digi-Key, ComponentLink2Description=https://datasheet.ciiva.com/1943/tps2375-1943070.pdf?src-supplier=Digi-Key, ComponentLink2URL=https://datasheet.ciiva.com/1943/tps2375-1943070.pdf?src-supplier=Digi-Key, ComponentLink3Description=https://datasheet.ciiva.com/1943/tps2375-1943072.pdf?src-supplier=Digi-Key, ComponentLink3URL=https://datasheet.ciiva.com/1943/tps2375-1943072.pdf?src-supplier=Digi-Key, ComponentLink4Description=https://datasheet.ciiva.com/14248/tps2375-14248055.pdf?src-supplier=Avnet, ComponentLink4URL=https://datasheet.ciiva.com/14248/tps2375-14248055.pdf?src-supplier=Avnet, Height=1.58mm, Item Type=IC, Lead Free="Lead Free", Length=5mm, Manufacturer Part Number=TPS2375DR, Number of Channels=1, Packaging="Tape and Reel", Pins=8, Pricing 1="1=2.94, 10=2.65, 50=2.5, 100=2.13, 1000=1.45, 10000=1.29 (USD)", Radiation Hardening=No, RoHS=Yes, RoHS Compliant=Yes, Series=-, Stock 1=12566, Supplier 1=Mouser, Weight=0.002561oz
U21: "TVS DIODE 5.5VWM 8.5VC SOT23-5", Breakdown Voltage=5.5V, Case/Package=SOT-23, Clamping Voltage=7.8V, Clamping Voltage-Max=8V, LCSC Part Number=C10675, Leakage Current=100nA, Manufacturer=Littelfuse, Max Operating Temperature=85°C, Max Power Dissipation=225mW, Min Operating Temperature=-40°C, Power Line Protection=No, Supplier Part Number 1=3283009, Voltage Rating (DC)=5V, Category="TVS Diodes", ComponentLink1Description=https://datasheet.ciiva.com/15143/getdatasheetpartid-152299-15143806.pdf?src-supplier=Verical, ComponentLink1URL=https://datasheet.ciiva.com/15143/getdatasheetpartid-152299-15143806.pdf?src-supplier=Verical, ComponentLink2Description=https://datasheet.ciiva.com/4509/sp05x-leadfree-4509638.pdf?src-supplier=Mouser, ComponentLink2URL=https://datasheet.ciiva.com/4509/sp05x-leadfree-4509638.pdf?src-supplier=Mouser, ComponentLink3Description=https://datasheet.ciiva.com/22697/1911798-22697943.pdf?src-supplier=Element14, ComponentLink3URL=https://datasheet.ciiva.com/22697/1911798-22697943.pdf?src-supplier=Element14, ComponentLink4Description=https://datasheet.ciiva.com/8062/littefuse-spa-sp050x-8062425.pdf?src-supplier=Element14, ComponentLink4URL=https://datasheet.ciiva.com/8062/littefuse-spa-sp050x-8062425.pdf?src-supplier=Element14, ComponentLink5Description=https://datasheet.ciiva.com/332/sp05xxba-332619.pdf?src-supplier=Digi-Key, ComponentLink5URL=https://datasheet.ciiva.com/332/sp05xxba-332619.pdf?src-supplier=Digi-Key, ComponentLink6Description=https://datasheet.ciiva.com/332/sp05xxba-332620.pdf?src-supplier=Digi-Key, ComponentLink6URL=https://datasheet.ciiva.com/332/sp05xxba-332620.pdf?src-supplier=Digi-Key, ComponentLink7Description=https://datasheet.ciiva.com/16393/sp05xxba-16393404.pdf?src-supplier=Future+Electronics, ComponentLink7URL=https://datasheet.ciiva.com/16393/sp05xxba-16393404.pdf?src-supplier=Future+Electronics, ComponentLink8Description=https://datasheet.ciiva.com/332/sp05xxba-332621.pdf?src-supplier=Digi-Key, ComponentLink8URL=https://datasheet.ciiva.com/332/sp05xxba-332621.pdf?src-supplier=Digi-Key, ComponentLink9Description=https://datasheet.ciiva.com/1268/526672-1268494.pdf?src-supplier=Element14, ComponentLink9URL=https://datasheet.ciiva.com/1268/526672-1268494.pdf?src-supplier=Element14, Depth=1.75mm, Diode Type=ZENER, Direction=Unidirectional, ESD Protection=Yes, Height=1.3mm, Item Type="TVS Diode", Lead Free="Lead Free", Length=3.05mm, Manufacturer Part Number=SP0504BAHTG, Max Reverse Leakage Current=100nA, Mounting Technology="Surface Mount", Number of Channels=4, Number of Elements=4, Number of Unidirectional Channels=4, Packaging="Tape and Reel", Peak Pulse Power=225mW, Pins=5, Polarity=Bidirectional,Unidirectional, Power Dissipation=225mW, Pricing 1="1=0.78, 15=0.685, 75=0.625, 300=0.575, 1500=0.52 (USD)", Radiation Hardening=No, Reach SVHC Compliant=Unknown, Reverse Standoff Voltage=5.5V, RoHS=Yes, RoHS Compliant=Yes, Series="SP05, SPA®", Stock 1=1611, Supplier 1="Future Electronics", Termination=SMD/SMT, Width=1.75mm, Working Voltage=5.5V
U22: "Step-down type SOIC-8-EP DC-DC Converters ROHS", LCSC Part Number=C329267, Manufacturer=XDS, Package=SOIC-8-EP, ComponentLink1Description=LCSC, ComponentLink1URL=https://www.lcsc.com/product-detail/DC-DC-Converters_XDS-TX4138_C329267.html, Item Type=IC, Manufacturer Part Number=TX4138
U23: "SPI LQFP-48(7x7) Ethernet ICs ROHS", LCSC Part Number=C32843, Manufacturer=WIZNET, Package=LQFP-48(7x7), ComponentLink1Description=LCSC, ComponentLink1URL=https://www.lcsc.com/product-detail/Ethernet-ICs_WIZNET-W5500_C32843.html, Item Type=IC, Manufacturer Part Number=W5500
U26: "Digital Metal-Oxide Multi-Gas Sensor", LCSC Part Number=C3659333, Manufacturer=ScioSense, Supplier Part Number 1=135-ENS160-BGLT, Category=Uncategorized, Item Type="Gas Sensor", Manufacturer Part Number=ENS160-BGLT, Pricing 1="1=12.8, 10=10.46, 50=9.67, 100=8.1, 1000=7.19, 10000=7.19 (USD)", RoHS=No, Stock 1=5978, Supplier 1=Mouser
U27: "400kHz SO-8 I/O Expanders ROHS", Case/Package=SO, Clock Frequency=400kHz, LCSC Part Number=C2688883, Manufacturer="NXP Semiconductors", Max Operating Temperature=85°C, Max Power Dissipation=200mW, Min Operating Temperature=-40°C, Nominal Supply Voltage=5.5V, Operating Supply Current=85mA, Output Current=50mA, Package Quantity=1, Category="Interface ICs", ComponentLink1Description=https://datasheet.ciiva.com/8125/pca9536-8125671.pdf?src-supplier=Avnet, ComponentLink1URL=https://datasheet.ciiva.com/8125/pca9536-8125671.pdf?src-supplier=Avnet, ComponentLink2Description=https://datasheet.ciiva.com/1779/pca9536-1779979.pdf?src-supplier=Digi-Key, ComponentLink2URL=https://datasheet.ciiva.com/1779/pca9536-1779979.pdf?src-supplier=Digi-Key, ComponentLink3Description=https://datasheet.ciiva.com/1779/pca9536-1779980.pdf?src-supplier=Digi-Key, ComponentLink3URL=https://datasheet.ciiva.com/1779/pca9536-1779980.pdf?src-supplier=Digi-Key, ComponentLink4Description=https://datasheet.ciiva.com/1779/pca9536-1779981.pdf?src-supplier=Digi-Key, ComponentLink4URL=https://datasheet.ciiva.com/1779/pca9536-1779981.pdf?src-supplier=Digi-Key, ComponentLink5Description=https://datasheet.ciiva.com/3148/pca9536-3148502.pdf?src-supplier=Avnet, ComponentLink5URL=https://datasheet.ciiva.com/3148/pca9536-3148502.pdf?src-supplier=Avnet, ComponentLink6Description=https://datasheet.ciiva.com/3149/pca9536-3149304.pdf?src-supplier=Avnet, ComponentLink6URL=https://datasheet.ciiva.com/3149/pca9536-3149304.pdf?src-supplier=Avnet, ComponentLink7Description=https://datasheet.ciiva.com/16291/pca9536-16291035.pdf?src-supplier=Future+Electronics, ComponentLink7URL=https://datasheet.ciiva.com/16291/pca9536-16291035.pdf?src-supplier=Future+Electronics, Frequency=400kHz, Interface=I2C,SMBus,Serial, Item Type=IC, Lead Free="Lead Free", Manufacturer Part Number=PCA9536D,118, Mounting Technology="Surface Mount", Number of I/Os=4, Operating Supply Voltage=5.5V, Packaging="Tape and Reel", Pins=8, Pricing="494=0.72487, 500=0.70966, 990=0.68938, 2500=0.67925, 5000=0.66404, 25000=0.64883, 50000=0.62856 (USD)", RoHS=Yes, RoHS Compliant=Yes, Series=-, Stock=96987, Supplier=Avnet, Supplier Part Number=PCA9536D,118, Supply Current=85mA, Weight=0.01787oz
X1: library part DXTF321532768C10F, "32.768kHz 7pF ±10ppm SMD3215-2P Crystals ROHS", LCSC Part Number=C5830643, Manufacturer=Shenzhen, Package=SMD3215-2P, ComponentLink1Description=LCSC, ComponentLink1URL=https://www.lcsc.com/product-detail/Crystals_Shenzhen-SCTF-Elec-DXTF321532768C10F_C5830643.html, Item Type=Crystal, Manufacturer Part Number=DXTF321532768C10F
X2: library part X50328MSB2GI, "8MHz 20pF ±10ppm ±50ppm SMD5032-2P Crystals ROHS", LCSC Part Number=C115962, Manufacturer="Yangxing Tech", Package=SMD5032-2P, ComponentLink1Description=LCSC, ComponentLink1URL=https://www.lcsc.com/product-detail/Crystals_Yangxing-Tech-X50328MSB2GI_C115962.html, Item Type=Crystal, Manufacturer Part Number=X50328MSB2GI
X3: library part Q22FA12800090, "CRYSTAL 25.0000MHZ 12PF SMD", LCSC Part Number=C255883, Manufacturer="Seiko Epson", Package=SMD2016-4P, ComponentLink1Description=LCSC, ComponentLink1URL=https://www.lcsc.com/product-detail/Crystals_Seiko-Epson-Q22FA12800090_C255883.html, Item Type=Crystal, Manufacturer Part Number=Q22FA12800090
X4: library part X322540MPB4SI, "40MHz SMD Crystal Resonator 15pF SMD3225-4P Crystals ROHS", LCSC Part Number=C9010, Manufacturer="Yangxing Tech", ComponentLink1Description=LCSC, ComponentLink1URL=https://www.lcsc.com/product-detail/Crystals_Yangxing-Tech-X322540MPB4SI_C9010.html, Item Type=Crystal, Manufacturer Part Number=X322540MPB4SI
X5: "80.00000MHz 3.3V-/+20PPM", Manufacturer=YXC, ComponentLink1Description=Datasheet, ComponentLink1URL=http://oss.mokotechnology.com/uploads/20240304/1709535755274_YSO690PR%2080MHZ%203.3V%20%C2%B120PPM%20CMOS%20O97EI-112-80M.pdf, Manufacturer Part Number=YSO690PR

## Free pads (board coordinates)
  round 0 hole 12 unplated: MH6(35.712,28.169)
  round 0 hole 3 unplated: MH7(-30.602,-53.628) MH7(-30.602,53.628) MH9(50.737,37.948)
  round 0 hole 1.5 unplated: MH10(-5.973,2.574) MH10(5.973,-2.574)

## Via types
v1: diameter 0.6, hole 0.3, Top Layer to Bottom Layer, 557 vias

## Nets (pads, with @x,y where several pads share a name; then routed paths per layer and width w, separated by ;. In a path a pad name is that pad's centre, name@x,y a point inside that pad or via, vN(x,y) a via of type N, cw(c..) or ccw(c..) an arc to the next point about the centre after c; other vN are vias at no path point)
1V8: C12.2 C14.2 C117.2 FB4.1 P45.1 U2.5 U26.4 | length 107.4
  Top Layer w0.381: v1(-39.167,-59.854) C117.2@-37.096,-59.854 U26.4@-37.096,-58.688
  Bottom Layer w0.203: v1(-39.167,-59.854) -39.805,-59.216 -39.805,-43.803 -40.303,-43.304 -42.688,-43.304 -43.534,-42.457 -43.534,-36.007 -42.858,-35.331 -36.261,-35.331 -35.025,-36.567 -25.409,-36.567 v1(-24.155,-37.821)
  Bottom Layer w0.381: v1(-39.167,-59.854) -36.493,-59.854 -35.382,-58.743 -35.382,-50.932 -33.329,-48.879 5.927,-48.879 7.416,-50.368 7.535,-50.368
1V8_SENSOR: C16.2 C113.2 C114.2 C115.2 FB4.2 FB7.1 FB11.2 FB12.2 FB13.2 FB15.2 FB16.2 FB17.2 P2.1 | length 46.2
  Top Layer w0.203: v1(-19.888,-37.821) -19.888,-57.375 -19.09,-58.174 -10.611,-58.174 -10.035,-58.749 C115.2@-10.035,-59.581 C115.2@-10.035,-59.648
  Top Layer w0.33: C115.2@-10.035,-59.648 -9.972,-59.711 FB17.2@-9.037,-59.711 -4.563,-59.711 -3.966,-60.308 v1(-3.966,-62.263) FB12.2@-5.079,-62.263 ; FB11.2@1.343,-65.611 v1(1.343,-62.232) ; FB7.1@5.05,-63.246 5.052,-63.244 5.052,-62.232 v1(5.055,-62.23)
  Bottom Layer w0.33: FB13.2@-5.236,-62.854 -4.557,-62.854 v1(-3.966,-62.263)
  other v1: -3.746,-68.011 6.038,-52.579 7.285,-52.579
3V3: C19.1 C24.2 C27.2 C28.2 C29.2 C32.2 C48.2 C49.2 C50.2 C51.2 C54.2 C58.2 C59.2 C69.2 C86.2 C87.2 C98.1 C116.2 C120.2 FB8.1 J6.1 J12.1 L4.1 P7.1 Q5.1 Q6.2 R13.2 R20.1 R21.1 R22.1 R23.2 R24.2 R32.2 R33.1 R36.2 R37.2 R38.2 R40.2 R41.1 R44.2 R55.1 R56.2 U3.2 U7.1 U9.2 U9.5 U9.6 U9.8 U10.20 U10.29 U10.46 U10.55 U10.56 U14.8 U15.1 U19.1 U19.8 U26.5 U26.7 U27.8 | length 183.2
  Top Layer w0.229: v1(-7.213,13.921) -7.18,13.921 -6.893,14.208 -6.493,14.208 C49.2@-6.423,14.278 ; C49.2@-6.467,14.322 -6.467,14.951 -6.239,15.179 U10.20@-6.239,16.125 ; U10.46@-4.239,23.186 -4.239,23.764 -3.983,24.02 v1(-2.946,24.02) C50.2@-2.946,24.836 ; v1(-0.123,15.085) 0.63,15.837 0.63,16.819 0.409,17.04 C54.2@-0.123,17.04
  Top Layer w0.254: U26.7@-36.046,-56.588 -35.026,-56.588 -34.709,-56.906 C116.2@-34.709,-58.688 ; v1(-6.956,8.259) -6.956,5.385 -6.511,4.94 -5.881,4.94 -5.415,5.405 -5.415,6.594 -4.236,7.773 4.861,7.773 5.457,7.177 v1(5.457,3.792)
  Top Layer w0.305: C58.2@-13.278,19.713 -13.214,19.713 -12.986,19.485 -12.986,19.315 -12.696,19.026 -12.248,19.026 R36.2@-12.172,18.95 ; C48.2@-8.239,24.164 C32.2@-8.239,25.206 v1(-8.239,25.858) ; FB8.1@10.645,-63.246 v1(11.534,-63.246) ; R32.2@41.958,43.557 41.996,43.557 42.372,43.934 43.719,43.934 v1(44.36,43.293) ; R23.2@61.466,8.313 62.534,8.313 63.096,8.875 v1(63.096,12.063) R24.2@61.466,12.063
  Top Layer w0.33: v1(25.925,-60.838) 25.928,-60.835 26.923,-60.835 R21.1@26.925,-60.833 ; v1(26.925,-57.638) R20.1@26.925,-56.363
  Top Layer w0.381: U26.5@-36.046,-58.688 C116.2@-34.709,-58.688 v1(-33.68,-58.688) ; J12.1@-13.223,48.913 -13.215,48.921 -13.215,50.335 -13.207,50.343 -13.207,51.729 J6.1@-11.215,53.721 ; v1(-6.956,8.259) R37.2@-6.956,11.661 ; v1(-5.047,0.468) C86.2@-2.115,0.468 -2.026,0.468 -1.844,0.65 U15.1@-0.9,0.65 ; v1(-2.739,10.566) R38.2@-2.739,11.655 ; v1(1.753,20.777) 1.753,20.836 1.95,21.034 U14.8@1.95,22.638 ; R56.2@13.57,-34.735 v1(14.531,-34.735) ; R22.1@38.19,-56.368 38.19,-55.366 38.59,-54.966 44.583,-54.966 v1(45.364,-54.184) ; U9.2@68.65,2.318 v1(69.504,2.318) ; U9.8@71.05,1.518 C29.2@71.05,0.428 v1(71.628,0.428) ; C28.2@71.05,4.928 v1(71.628,4.928)
  Layer 3 w0.508: 54.517,0.588 54.517,-1.873 55.006,-2.362 56.567,-2.362 57.025,-1.904 57.025,-0.211 57.323,0.087 63.333,0.087 v1(64.542,-1.122)
  Bottom Layer w0.305: 0.858,19.407 0.932,19.482 1.485,19.482 1.753,19.749 v1(1.753,20.777) ; v1(5.457,3.792) 5.457,9.547 6.274,10.363 12.755,10.363 13.106,10.715 13.106,13.255 12.764,13.596 v1(11.535,13.596) ; U19.8@36.654,-53.534 38.936,-53.534 39.936,-52.534 U19.1@41.054,-52.534 ; 41.746,-52.094 R44.2@42.851,-52.094 43.855,-52.094 44.123,-51.826 45.039,-51.826 45.364,-52.152 v1(45.364,-54.184)
  Bottom Layer w0.381: v1(-57.136,40.585) -57.103,40.552 -56.332,40.552 R40.2@-56.299,40.519 ; v1(-14.207,20.732) -14.148,20.732 -14.097,20.681 -13.239,20.681 C27.2@-13.208,20.65 ; v1(-5.047,0.468) -7.733,0.468 -8.365,1.101 -8.365,6.85 v1(-6.956,8.259) -3.579,8.259 -2.739,9.098 v1(-2.739,10.566) ; R13.2@32.842,-44.945 40.451,-44.945 v1(43.169,-47.663) ; v1(64.542,-1.122) 66.451,-1.122 66.964,-1.635 66.964,-3.544 67.89,-4.47 70.769,-4.47 71.628,-3.611 v1(71.628,0.428) 71.628,1.54 70.85,2.318 v1(69.504,2.318) ; v1(68.65,-1.911) 69.504,-1.057 v1(69.504,2.318) ; v1(71.628,4.928) 70.383,4.928 69.504,4.05 v1(69.504,2.318)
  other v1: -26.289,-37.821 31.2,-28.077 32.542,-28.08 33.884,-28.083 31.2,-27.027 32.542,-27.03 33.884,-25.883 31.2,-25.877 32.542,-25.88 8.663,31.344 16.408,31.344 8.663,32.36 16.408,32.36 8.663,33.35 16.408,33.35 -13.207,51.283
3V3_AUD: C42.1 C43.1 C45.2 C47.2 C88.2 C89.2 C90.2 C91.2 C94.2 C95.2 C96.2 C97.2 J4.4 J7.4 J10.3 J11.3 R27.1 R72.2 R73.2 U12.1 U13.1 U13.13 U13.19 U13.32 U13.48 U13.64 U16.1 U17.1 U24.1 U25.1 | length 455.1
  Top Layer w0.203: C96.2@-41.784,-37.196 -40.706,-37.196 -39.901,-38.001 U24.1@-39.901,-38.276 ; U17.1@-39.025,38.275 -39.025,38 -38.25,37.225 C91.2@-37.07,37.225 ; C88.2@35.89,-37.225 C90.2@36.957,-37.225 38.25,-37.225 39.025,-38 U16.1@39.025,-38.275 ; U25.1@39.902,38.275 39.902,38 40.708,37.195 C97.2@41.986,37.195
  Top Layer w0.254: v1(-42.85,-38.951) C94.2@-42.851,-37.196 C96.2@-41.784,-37.196 ; v1(-39.476,-42.786) R72.2@-39.476,-41.796 ; C91.2@-37.07,37.225 C89.2@-36.08,37.225 -34.45,37.225 -34.203,36.978 v1(-34.203,36.278) ; C88.2@35.89,-37.225 35.89,-38.334 v1(36.506,-38.95) ; R73.2@39.476,41.82 v1(39.476,42.874) ; C97.2@41.986,37.195 C95.2@42.977,37.195 v1(42.977,38.95)
  Top Layer w0.381: v1(39.476,42.874) 29.439,42.874 28.132,41.566 28.132,19.62 28.981,18.771 38.521,18.771 39.853,17.439 v1(39.853,8.382) v1(39.853,4.948) ; J11.3@51.908,-46.641 J11.3@51.908,-46.503
  Top Layer w0.508: v1(50.146,-40.957) J10.3@53.729,-43.924 53.729,-44.062 51.516,-46.275 J11.3@51.516,-46.413 ; v1(51.765,4.687) 52.196,4.687 52.74,4.144 52.74,0.887 51.923,0.07 v1(51.923,-6.806) ; v1(55.036,-6.806) v1(51.923,-6.806) ; J7.4@62.635,-30.152 J4.4@58.516,-27.595 51.539,-20.619 51.539,-7.189 v1(51.923,-6.806)
  Bottom Layer w0.203: v1(39.476,42.874) 42.14,42.874 42.977,42.037 v1(42.977,38.95) ; U13.1@51.084,-6.802 U13.1@51.088,-6.806